# Altium PCB MezzanineDCDC_R1_test.PcbDoc (part 1 of 2)
Units mm, origin at the board's own origin, x right, y up, seen from the top; angles counter-clockwise.
Board outline 70 x 70 mm, 4 copper layers (Top Layer, GND 1, Signal, Bottom Layer), stack 1.554 mm thick; 95 components, 53 nets, 436 pads, 382 vias.
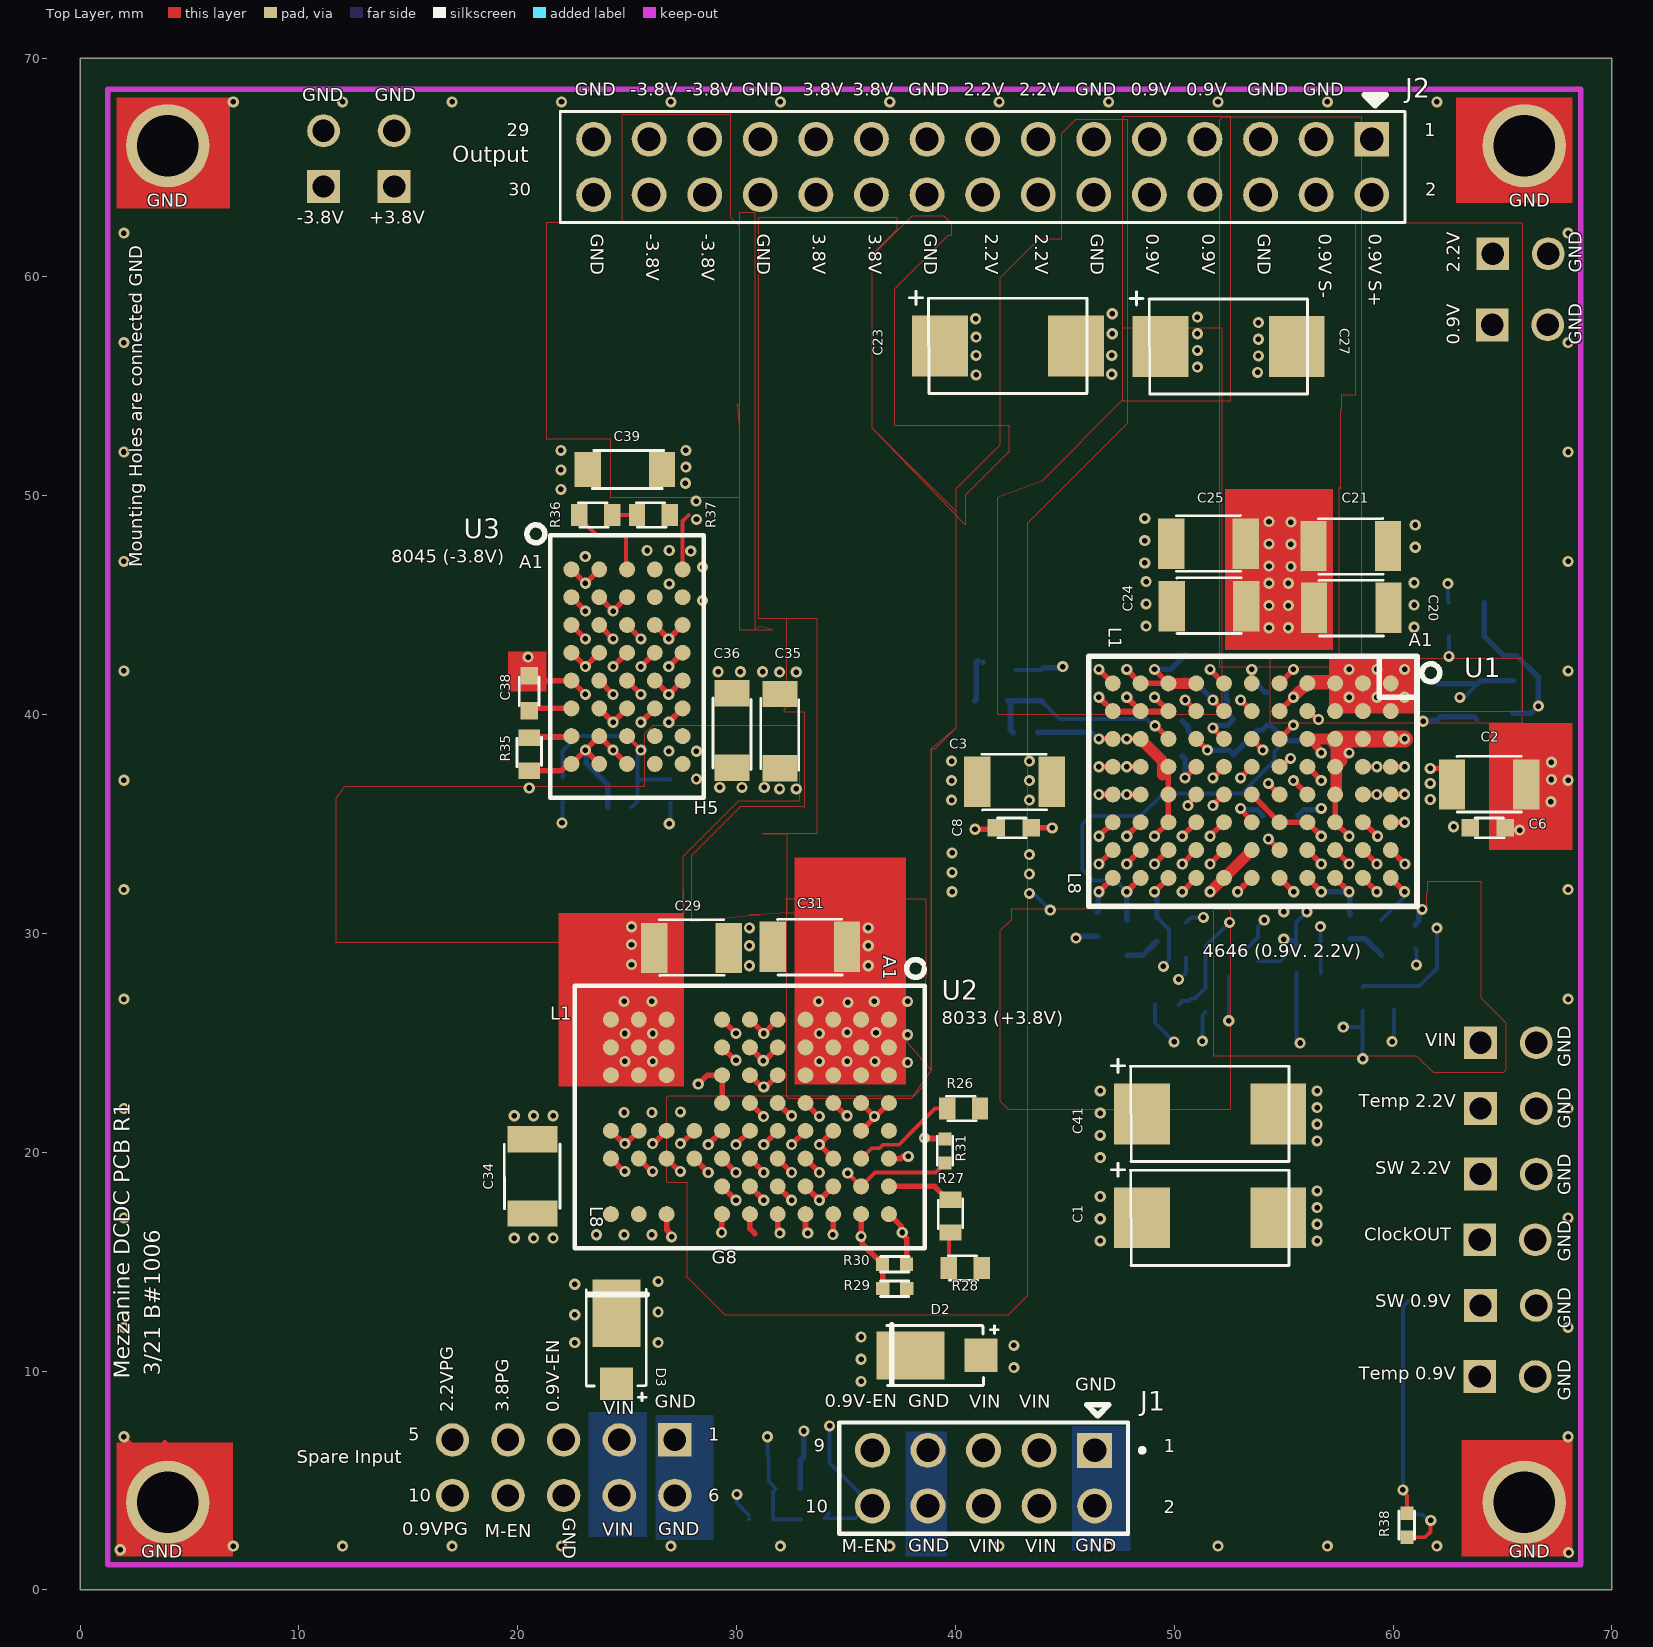
[diagram p0: Top Layer view]
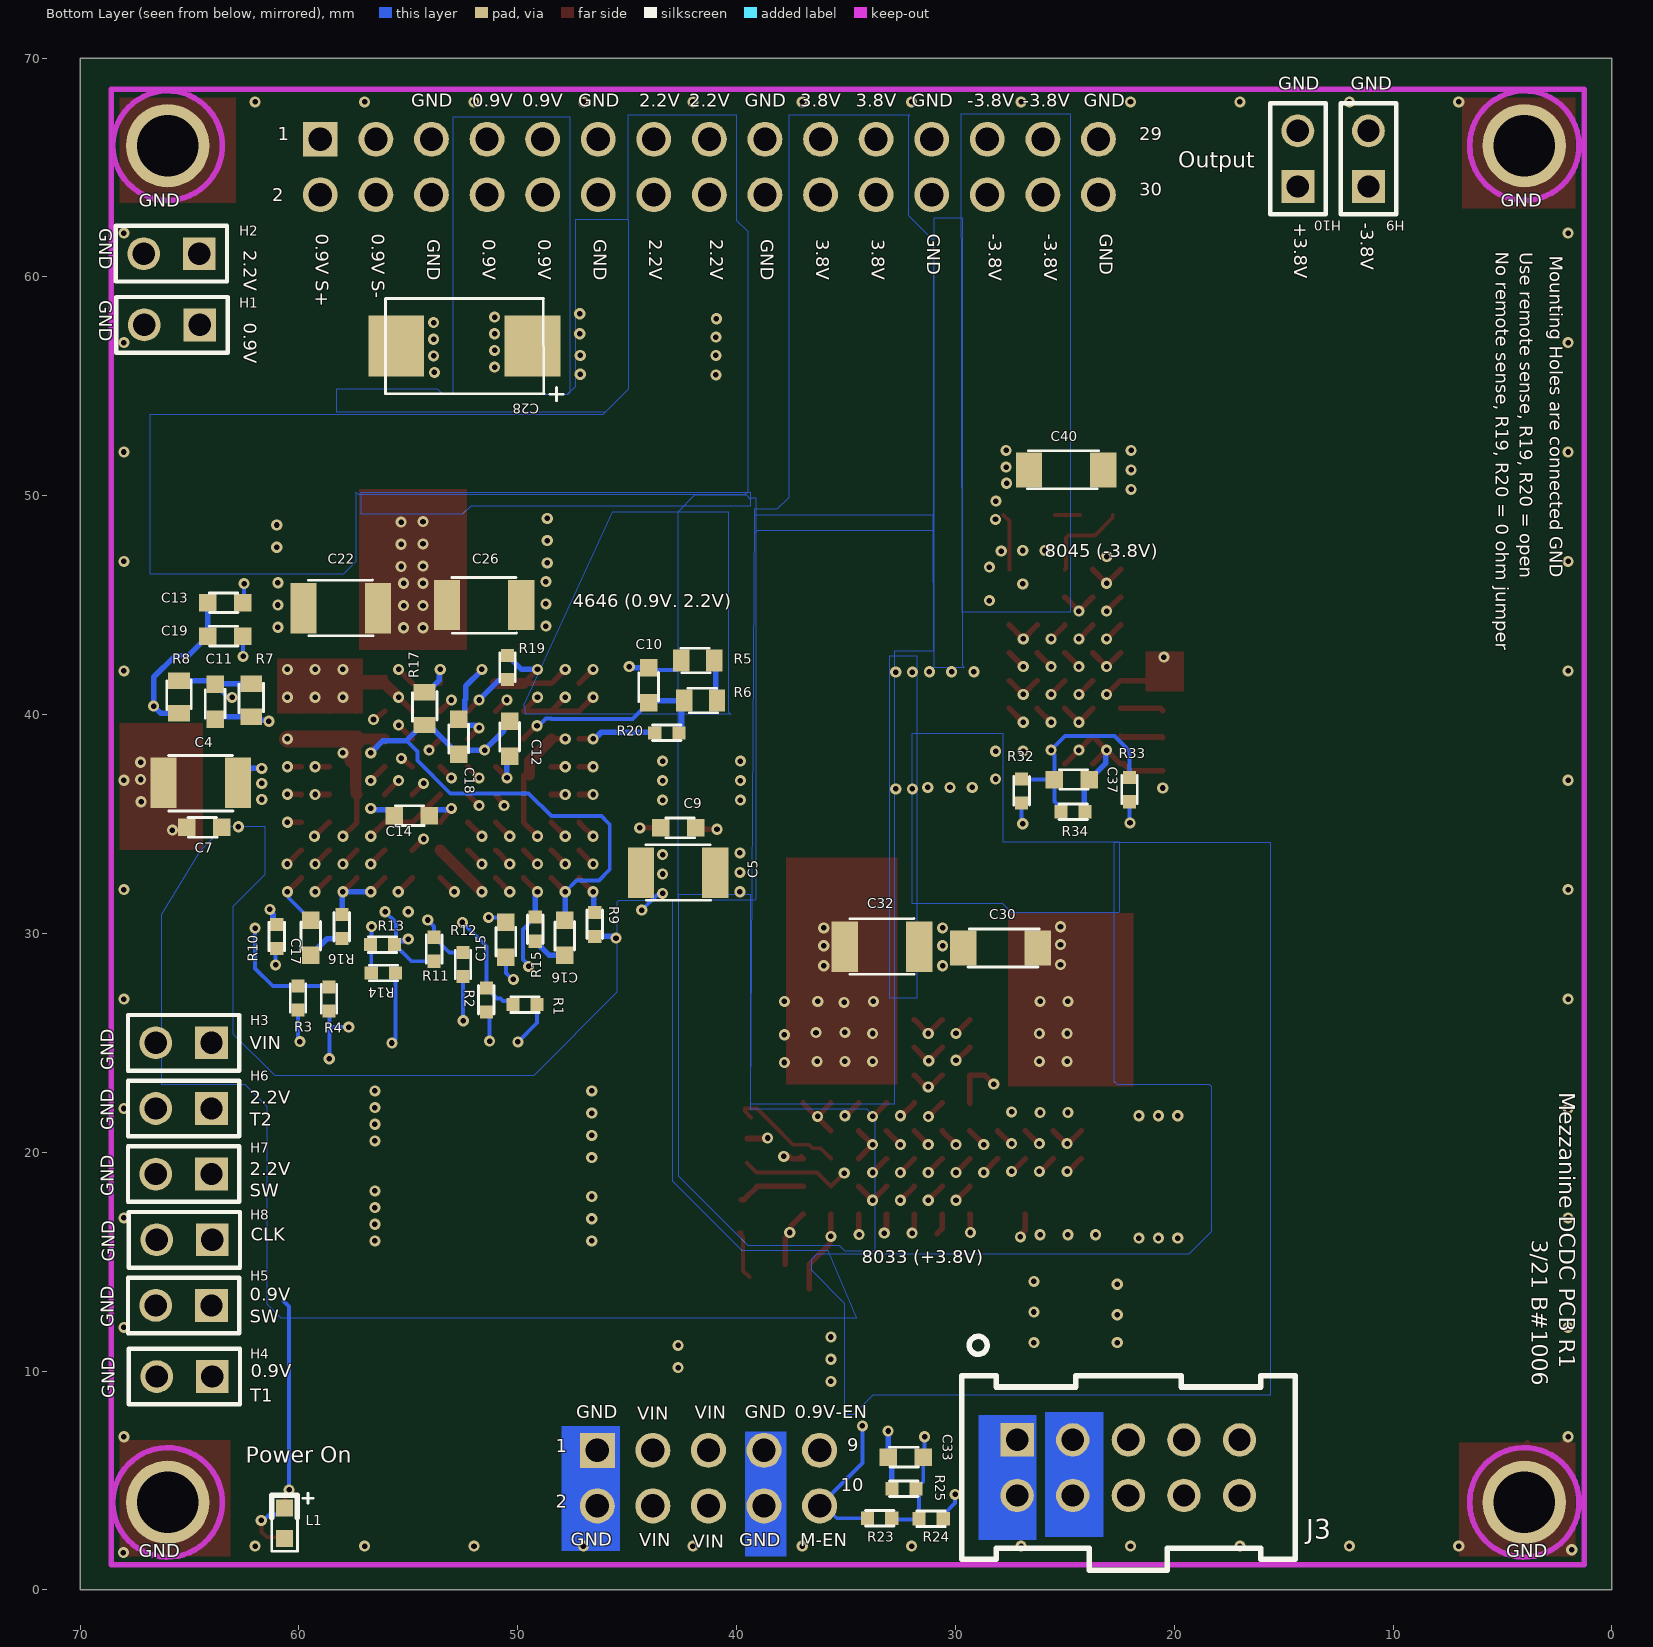
[diagram p1: Bottom Layer view, seen from below]
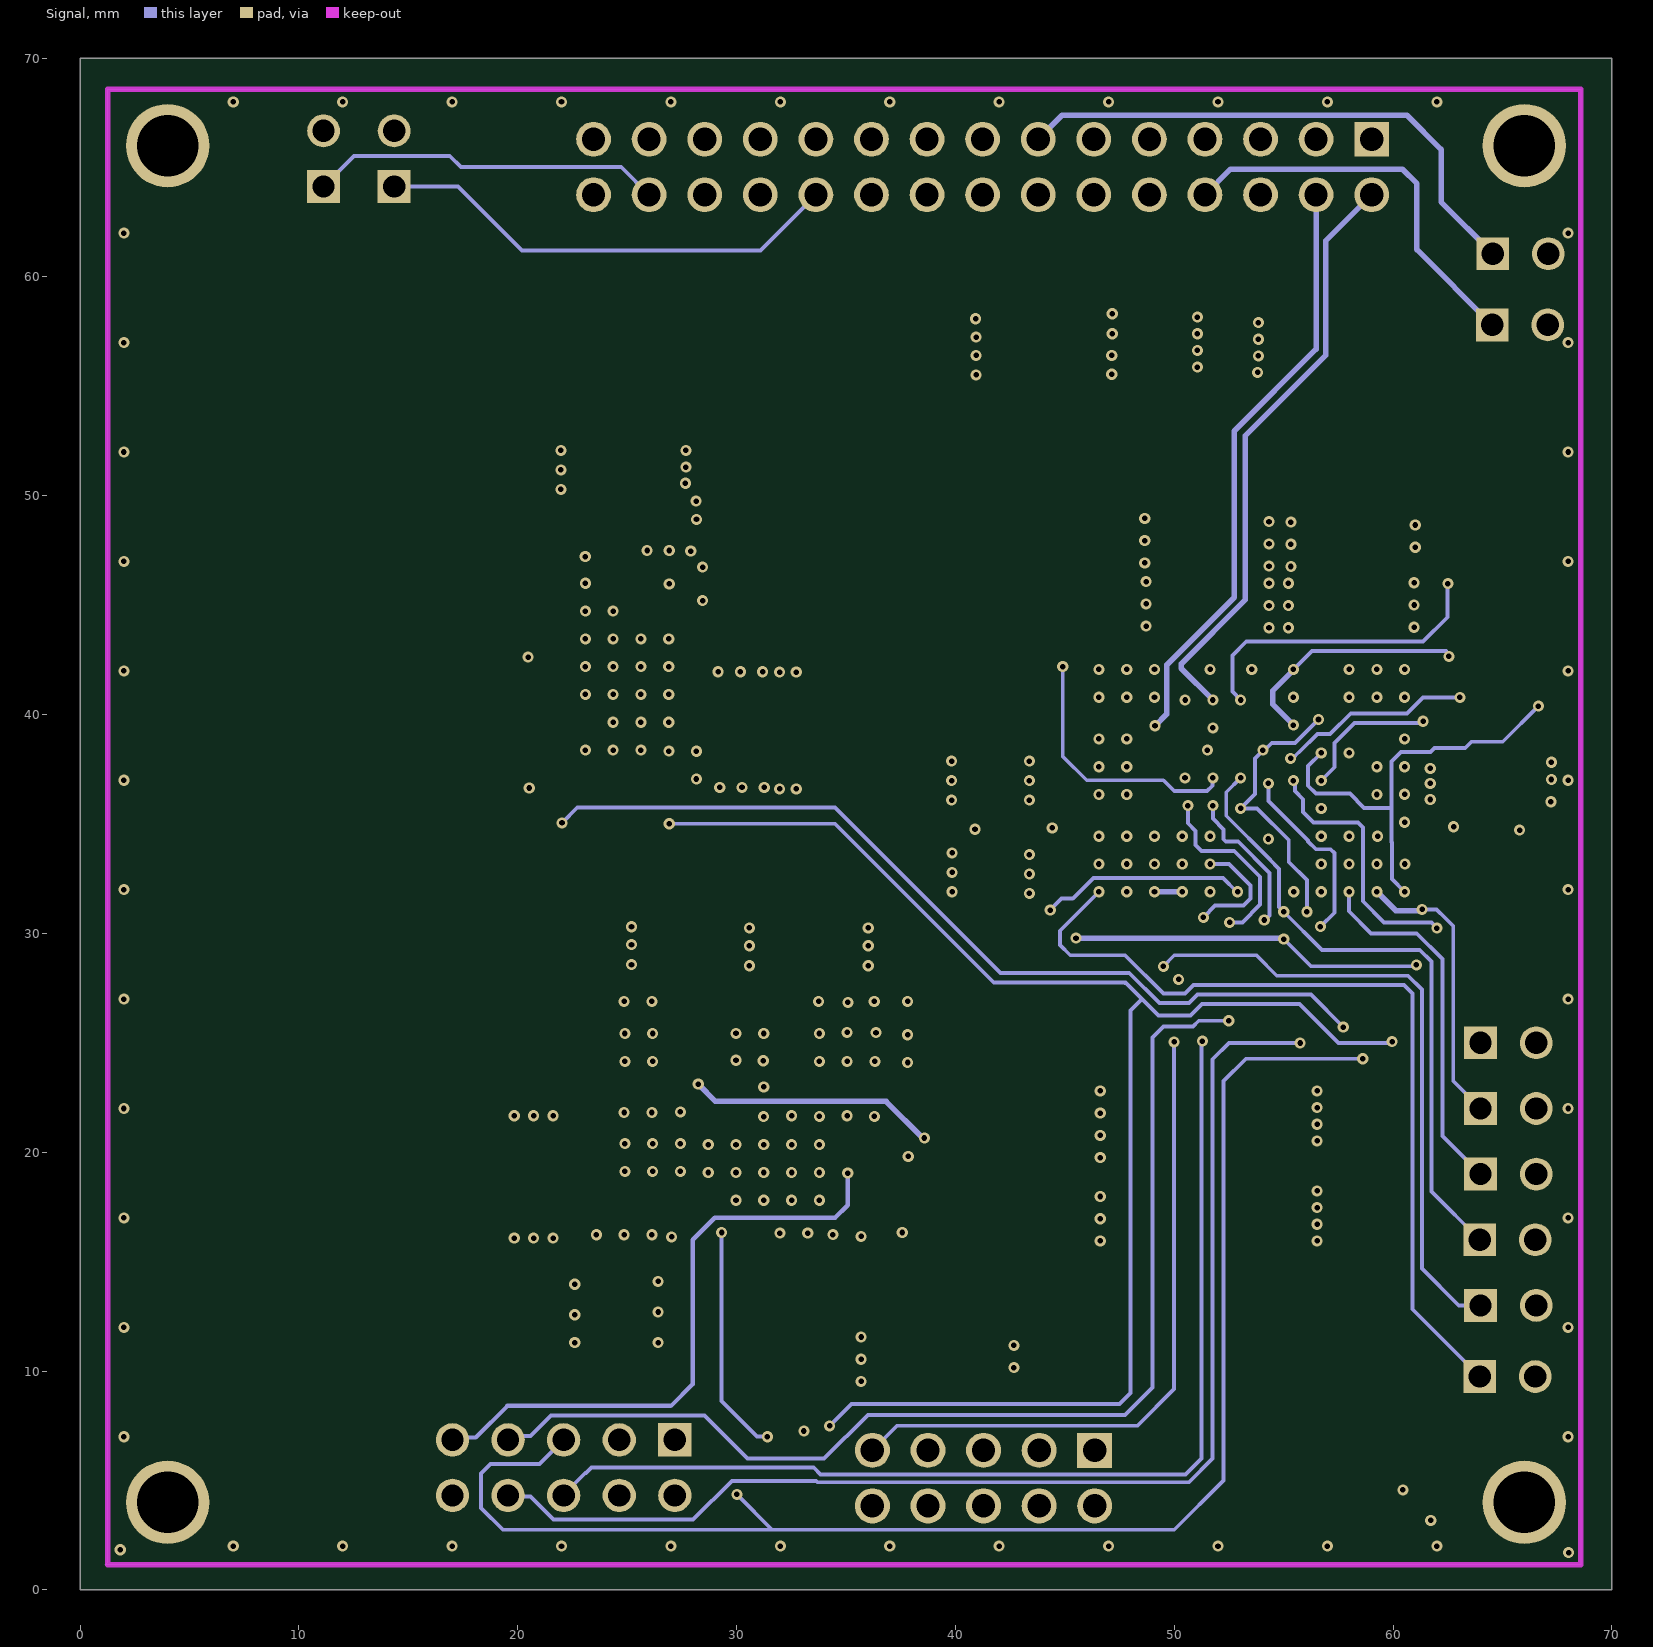
[diagram p2: Signal]

## Layer stack, top to bottom
Top Solder: solder mask 0.0102, Solder Resist, Dk 3.5
Top Layer: signal copper 0.0711
Dielectric 4: prepreg 0.1626, PP-006, Dk 4.1
GND 1: signal copper 0.0356
Dielectric 1: dielectric 1.016, FR-4, Dk 4.8
Signal: signal copper 0.0356
Dielectric 5: prepreg 0.1626, PP-006, Dk 4.1
Bottom Layer: signal copper 0.0711
Bottom Solder: solder mask 0.0102, Solder Resist, Dk 3.5

## Board outline
0,0 0,70 70,70 70,0

## Design rules (kind name [scope] priority, off if disabled: settings)
AssemblyTestPointUsage [All] p0: scope1count=1 scope1_0_kind=Board scope1_0_value=Board scope2count=1 scope2_0_kind=Board scope2_0_value=Board commentlength=0
AssemblyTestpoint [All] p0: scope1count=1 scope1_0_kind=Board scope1_0_value=Board scope2count=1 scope2_0_kind=Board scope2_0_value=Board commentlength=0
Clearance Clearance_1 [All] p0: scope1count=1 scope1_0_kind=Board scope1_0_value=Board scope2count=1 scope2_0_kind=Board scope2_0_value=Board commentlength=0 gap=0.178
Clearance Clearance_1 [All] p1: gap=0.178 ignorepadtopadclearanceinfootprint=FALSE except(0.254: Arc-Fill Arc-Poly Arc-Region Track-Fill Track-Poly Track-Region SMDPad-Fill SMDPad-Poly SMDPad-Region THPad-Fill THPad-Poly THPad-Region Via-Fill Via-Poly Via-Region Fill-Fill Fill-Poly Fill-Region Fill-Hole Poly-Poly Poly-Region Poly-Hole Region-Region Region-Hole)
ComponentClearance [All] p0: scope1count=1 scope1_0_kind=Board scope1_0_value=Board scope2count=1 scope2_0_kind=Board scope2_0_value=Board commentlength=0 gap=0.254 collisioncheckmode=3
DiffPairsRouting [All] p0: scope1count=1 scope1_0_kind=Board scope1_0_value=Board scope2count=1 scope2_0_kind=Board scope2_0_value=Board commentlength=0
DiffPairsRouting [All] p1: maxlimit=0.254 minlimit=0.254 mostfreqgap=0.254 substack1={2EBA0CF7-B037-426B-A4ED-88C65EFE7A22} toplayer_{2eba0cf7-b037-426b-a4ed-88c65efe7a22}_minwidth=0.381 toplayer_{2eba0cf7-b037-426b-a4ed-88c65efe7a22}_maxwidth=0.381 toplayer_{2eba0cf7-b037-426b-a4ed-88c65efe7a22}_prefwidth=0.381 midlayer1_{2eba0cf7-b037-426b-a4ed-88c65efe7a22}_minwidth=0.381 midlayer1_{2eba0cf7-b037-426b-a4ed-88c65efe7a22}_maxwidth=0.381 midlayer1_{2eba0cf7-b037-426b-a4ed-88c65efe7a22}_prefwidth=0.381 midlayer4_{2eba0cf7-b037-426b-a4ed-88c65efe7a22}_minwidth=0.381 midlayer4_{2eba0cf7-b037-426b-a4ed-88c65efe7a22}_maxwidth=0.381 midlayer4_{2eba0cf7-b037-426b-a4ed-88c65efe7a22}_prefwidth=0.381 bottomlayer_{2eba0cf7-b037-426b-a4ed-88c65efe7a22}_minwidth=0.381 bottomlayer_{2eba0cf7-b037-426b-a4ed-88c65efe7a22}_maxwidth=0.381 bottomlayer_{2eba0cf7-b037-426b-a4ed-88c65efe7a22}_prefwidth=0.381 toplayer_minwidth=0.381 toplayer_maxwidth=0.381 toplayer_prefwidth=0.381 midlayer1_minwidth=0.381 midlayer1_maxwidth=0.381 midlayer1_prefwidth=0.381 midlayer4_minwidth=0.381 midlayer4_maxwidth=0.381 midlayer4_prefwidth=0.381 bottomlayer_minwidth=0.381 bottomlayer_maxwidth=0.381 bottomlayer_prefwidth=0.381 substack2={2E0713D7-164F-4516-AF41-5BA8AA759C5D} toplayer_{2e0713d7-164f-4516-af41-5ba8aa759c5d}_minwidth=0.381 toplayer_{2e0713d7-164f-4516-af41-5ba8aa759c5d}_maxwidth=0.381 toplayer_{2e0713d7-164f-4516-af41-5ba8aa759c5d}_prefwidth=0.381 midlayer1_{2e0713d7-164f-4516-af41-5ba8aa759c5d}_minwidth=0.381 midlayer1_{2e0713d7-164f-4516-af41-5ba8aa759c5d}_maxwidth=0.381 midlayer1_{2e0713d7-164f-4516-af41-5ba8aa759c5d}_prefwidth=0.381 midlayer4_{2e0713d7-164f-4516-af41-5ba8aa759c5d}_minwidth=0.381 midlayer4_{2e0713d7-164f-4516-af41-5ba8aa759c5d}_maxwidth=0.381 midlayer4_{2e0713d7-164f-4516-af41-5ba8aa759c5d}_prefwidth=0.381 bottomlayer_{2e0713d7-164f-4516-af41-5ba8aa759c5d}_minwidth=0.381 bottomlayer_{2e0713d7-164f-4516-af41-5ba8aa759c5d}_maxwidth=0.381 bottomlayer_{2e0713d7-164f-4516-af41-5ba8aa759c5d}_prefwidth=0.381 maxuncoupledlength=12.7
FabricationTestPointUsage [All] p0: scope1count=1 scope1_0_kind=Board scope1_0_value=Board scope2count=1 scope2_0_kind=Board scope2_0_value=Board commentlength=0 valid=0 allowmultiple=FALSE
FabricationTestpoint [All] p0: scope1count=1 scope1_0_kind=Board scope1_0_value=Board scope2count=1 scope2_0_kind=Board scope2_0_value=Board commentlength=0 side=3 testpointundercomponent=TRUE minsize=1.016 maxsize=2.54 preferedsize=1.524 minholesize=0 maxholesize=1.016 preferedholesize=0.813 testpointgrid=0.025
FanoutControl Fanout_BGA [All] p0 off: scope1count=1 scope1_0_kind=Board scope1_0_value=Board scope2count=1 scope2_0_kind=Board scope2_0_value=Board commentlength=69 // Protel DXP Scope 1 Expression Was: IsBGA   Fanout_BGA (Default Rule)
FanoutControl Fanout_LCC [All] p0 off: scope1count=1 scope1_0_kind=Board scope1_0_value=Board scope2count=1 scope2_0_kind=Board scope2_0_value=Board commentlength=69 // Protel DXP Scope 1 Expression Was: IsLCC   Fanout_LCC (Default Rule)
FanoutControl Fanout_SOIC [All] p0 off: scope1count=1 scope1_0_kind=Board scope1_0_value=Board scope2count=1 scope2_0_kind=Board scope2_0_value=Board commentlength=71 // Protel DXP Scope 1 Expression Was: IsSOIC   Fanout_SOIC (Default Rule)
FanoutControl Fanout_Small [All] p0 off: scope1count=1 scope1_0_kind=Board scope1_0_value=Board scope2count=1 scope2_0_kind=Board scope2_0_value=Board commentlength=84 // Protel DXP Scope 1 Expression Was: (CompPinCount < 5)   Fanout_Small (Default Rule)
FanoutControl Fanout_Default [All] p0: scope1count=1 scope1_0_kind=Board scope1_0_value=Board scope2count=1 scope2_0_kind=Board scope2_0_value=Board commentlength=30 // Fanout_Default (Default Rule)
Height [All] p0: scope1count=1 scope1_0_kind=Board scope1_0_value=Board scope2count=1 scope2_0_kind=Board scope2_0_value=Board commentlength=0
HoleSize [All] p0: scope1count=1 scope1_0_kind=Board scope1_0_value=Board scope2count=1 scope2_0_kind=Board scope2_0_value=Board commentlength=0 absolutevalues=TRUE maxlimit=3.048 minlimit=0.127 maxpercent=80.000 minpercent=20.000
HoleSize [All] p1: absolutevalues=TRUE maxlimit=3.048 minlimit=0.127 maxpercent=80.000 minpercent=20.000
HoleToHoleClearance [All] p0: scope1count=1 scope1_0_kind=Board scope1_0_value=Board scope2count=1 scope2_0_kind=Board scope2_0_value=Board commentlength=0
LayerPairs [All] p0: scope1count=1 scope1_0_kind=Board scope1_0_value=Board scope2count=1 scope2_0_kind=Board scope2_0_value=Board commentlength=0 enforce=TRUE
MinimumAnnularRing MinimumAnnularRing_1 [All] p0: scope1count=1 scope1_0_kind=Board scope1_0_value=Board scope2count=1 scope2_0_kind=Board scope2_0_value=Board commentlength=0 minimumring=0.178
MinimumAnnularRing [All] p0 off: scope1count=1 scope1_0_kind=Board scope1_0_value=Board scope2count=1 scope2_0_kind=Board scope2_0_value=Board commentlength=44 minimumring=0.127 // Protel DXP Scope 1 Expression Was: IsVia
MinimumAnnularRing [IsVia] p1: minimumring=0.127
MinimumAnnularRing MinimumAnnularRing_1 [All] p2: minimumring=0.178
MinimumSolderMaskSliver [All] p0 off: scope1count=1 scope1_0_kind=Board scope1_0_value=Board scope2count=1 scope2_0_kind=Board scope2_0_value=Board commentlength=0
MinimumSolderMaskSliver [All] p1 off: minsoldermaskwidth=0.254
NetAntennae [All] p0: scope1count=1 scope1_0_kind=Board scope1_0_value=Board scope2count=1 scope2_0_kind=Board scope2_0_value=Board commentlength=0
PasteMaskExpansion [All] p0: scope1count=1 scope1_0_kind=Board scope1_0_value=Board scope2count=1 scope2_0_kind=Board scope2_0_value=Board commentlength=0 expansion=0
PlaneClearance [All] p0: scope1count=1 scope1_0_kind=Board scope1_0_value=Board scope2count=1 scope2_0_kind=Board scope2_0_value=Board commentlength=0 clearance=0.508
PlaneConnect [All] p0: scope1count=1 scope1_0_kind=Board scope1_0_value=Board scope2count=1 scope2_0_kind=Board scope2_0_value=Board commentlength=0 planeconnectstyle=Relief reliefexpansion=0.508 reliefentries=4 reliefconductorwidth=0.254 reliefairgap=0.254
PolygonConnect [All] p0: scope1count=1 scope1_0_kind=Board scope1_0_value=Board scope2count=1 scope2_0_kind=Board scope2_0_value=Board commentlength=0 connectstyle=Relief reliefconductorwidth=0.254 reliefentries=4 polygonreliefangle="90 Angle"
PolygonConnect [All] p1: connectstyle=Relief reliefconductorwidth=0.254 reliefentries=4 polygonreliefangle="90 Angle" airgapwidth=0.254
RoutingCorners [All] p0: scope1count=1 scope1_0_kind=Board scope1_0_value=Board scope2count=1 scope2_0_kind=Board scope2_0_value=Board commentlength=0 cornerstyle=45-Degree minsetback=2.54 maxsetback=2.54
RoutingLayers [All] p0: scope1count=1 scope1_0_kind=Board scope1_0_value=Board scope2count=1 scope2_0_kind=Board scope2_0_value=Board commentlength=0 top layer=Automatic mid layer 1=Automatic mid layer 4=Automatic bottom layer=Automatic
RoutingPriority [All] p0: scope1count=1 scope1_0_kind=Board scope1_0_value=Board scope2count=1 scope2_0_kind=Board scope2_0_value=Board commentlength=0
RoutingTopology [All] p0: scope1count=1 scope1_0_kind=Board scope1_0_value=Board scope2count=1 scope2_0_kind=Board scope2_0_value=Board commentlength=0 topology=Shortest
RoutingVias [All] p0: scope1count=1 scope1_0_kind=Board scope1_0_value=Board scope2count=1 scope2_0_kind=Board scope2_0_value=Board commentlength=0 holewidth=0.711 width=1.27 viastyle="Through Hole" minholewidth=0.711 minwidth=1.27 maxholewidth=0.711 maxwidth=1.27
RoutingVias [All] p1: holewidth=0.711 width=1.27 viastyle="Through Hole" minholewidth=0.711 minwidth=1.27 maxholewidth=0.711 maxwidth=1.27
ShortCircuit [All] p0: scope1count=1 scope1_0_kind=Board scope1_0_value=Board scope2count=1 scope2_0_kind=Board scope2_0_value=Board commentlength=0 allowed=FALSE
SilkToBoardRegionClearance [All] p0: scope1count=1 scope1_0_kind=Board scope1_0_value=Board scope2count=1 scope2_0_kind=Board scope2_0_value=Board commentlength=0
SilkToSilkClearance [All] p0 off: scope1count=1 scope1_0_kind=Board scope1_0_value=Board scope2count=1 scope2_0_kind=Board scope2_0_value=Board commentlength=0
SilkToSilkClearance [All] p1 off: silktosilkclearance=0.254
SilkToSolderMaskClearance [All] p0 off: scope1count=1 scope1_0_kind=Board scope1_0_value=Board scope2count=1 scope2_0_kind=Board scope2_0_value=Board commentlength=44 // Protel DXP Scope 1 Expression Was: IsPad
SilkToSolderMaskClearance [IsPad] p1 off: minsilkscreentomaskgap=0.254 clearancetoexposedcopper=TRUE
SolderMaskExpansion [All] p0: scope1count=1 scope1_0_kind=Board scope1_0_value=Board scope2count=1 scope2_0_kind=Board scope2_0_value=Board commentlength=0 expansion=0.127
SolderMaskExpansion [All] p1: expansion=0.127 istentingtop=FALSE
UnRoutedNet [All] p0: scope1count=1 scope1_0_kind=Board scope1_0_value=Board scope2count=1 scope2_0_kind=Board scope2_0_value=Board commentlength=0
UnpouredPolygon [All] p0: scope1count=1 scope1_0_kind=Board scope1_0_value=Board scope2count=1 scope2_0_kind=Board scope2_0_value=Board commentlength=0
Width [All] p0: scope1count=1 scope1_0_kind=Board scope1_0_value=Board scope2count=1 scope2_0_kind=Board scope2_0_value=Board commentlength=0 maxlimit=2.54 minlimit=0.178 preferedwidth=0.254
Width [All] p1: maxlimit=2.54 minlimit=0.178 preferedwidth=0.254 substack1={2EBA0CF7-B037-426B-A4ED-88C65EFE7A22} substack2={2E0713D7-164F-4516-AF41-5BA8AA759C5D}
25 further rules are at their usual default settings.

## Classes and differential pairs
component class U_MezzanineDCDC_4646: C1 C2 C3 C4 C5 C6 C7 C8 C9 C10 C11 C12 C13 C14 C15 C16 C17 C18 C19 C20 C21 C22 C23 C24 C25 C26 C27 C28 C41 H1 H2 H3 H4 H5 H6 H7 H8 R1 R2 R3 R4 R5 R6 R7 R8 R9 R10 R11 R12 R13 R14 R15 R16 R17 R19 R20 U1
component class U_MezzanineDCDC_8045: C35 C36 C37 C38 C39 C40 H9 R32 R33 R34 R35 R36 R37 U3
component class MezzanineDCDC_Overall: D2 D3 J1 J2 J3 L1 R38
component class U_MezzanineDCDC_8033: C29 C30 C31 C32 C33 C34 H10 R23 R24 R25 R26 R27 R28 R29 R30 R31 U2

## Components (designator, comment, footprint, x,y, rotation, side; value= is the part's Value field where it differs from the comment)
C1 "TAJE107K020RNJ" "CAP 2917 TANTALUM POLARIZED TAJE107K020RNJ" 48.53,17 r0 top locked
C2 "GRM32ER61E226KE15L" "CAP 1210 MURATA" 62.691,36.805 r0 top locked
C3 "GRM32ER61E226KE15L" "CAP 1210 MURATA" 44.398,36.934 r180 top locked
C4 "GRM32ER61E226KE15L" "CAP 1210 MURATA" 62.789,36.881 r0 bottom locked
C5 "GRM32ER61E226KE15L" "CAP 1210 MURATA" 44.37,32.766 r180 bottom locked
C6 "GCM188R71E105KA64D" "CAP 0603 TDK" 63.525,34.823 r0 top locked
C7 "GCM188R71E105KA64D" "CAP 0603 TDK" 63.526,34.849 r0 bottom locked
C8 "C1608X7R1E224K080AC" "CAP 0603 TDK" 43.459,34.823 r180 top locked
C9 "C1608X7R1E224K080AC" "CAP 0603 TDK" 43.459,34.823 r180 bottom locked
C10 "opt" "CAP 0603 TDK" 44.018,42.138 r270 bottom locked
C11 "opt" "CAP 0603 TDK" 63.83,41.376 r270 bottom locked
C12 "0603YC273KAT2A" "CAP 0603 TDK" 50.368,38.1 r90 bottom locked
C13 "0603YC273KAT2A" "CAP 0603 TDK" 62.56,45.11 r0 bottom locked
C14 "C1608X5R1C475K080AC" "CAP 0603 TDK" 54.051,35.382 r0 bottom locked
C15 "C1608X5R1C475K080AC" "CAP 0603 TDK" 50.546,30.505 r270 bottom locked
C16 "opt" "CAP 0603 TDK" 47.854,29.007 r90 bottom locked
C17 "opt" "CAP 0603 TDK" 59.461,29.007 r90 bottom locked
C18 "0603YC101KAT2A" "CAP 0603 TDK" 52.705,39.776 r270 bottom locked
C19 "0603YC101KAT2A" "CAP 0603 TDK" 62.56,43.586 r0 bottom locked
C20 "GRM32ER60J107ME20K" "CAP 1210 Murata" 59.792,44.882 r180 top locked
C21 "GRM32ER60J107ME20K" "CAP 1210 Murata" 59.766,47.701 r180 top locked
C22 "GRM32ER60J107ME20K" "CAP 1210 Murata" 59.792,44.856 r180 bottom locked
C23 "4TPE470MCL" "CAP 2917 Tantalum Polarized" 39.294,56.845 r0 top
C24 "GRM32ER60J107ME20K" "CAP 1210 Murata" 49.889,44.958 r0 top locked
C25 "GRM32ER60J107ME20K" "CAP 1210 Murata" 49.864,47.803 r0 top locked
C26 "GRM32ER60J107ME20K" "CAP 1210 Murata" 49.838,45.009 r0 bottom locked
C27 "4TPE470MCL" "CAP 2917 Tantalum Polarized" 49.378,56.82 r0 top locked
C28 "4TPE470MCL" "CAP 2917 Tantalum Polarized" 49.33,56.843 r0 bottom locked
C29 "GRM32ER61E226KE15L" "CAP 1210 MURATA" 26.242,29.337 r0 top locked
C30 "UMK316BJ475KL-T" "CAP 1206 TDK" 26.242,29.337 r0 bottom locked
C31 "LMK325BJ107MM-T" "CAP 1210 MURATA" 35.05,29.388 r180 top locked
C32 "OPT" "CAP 1210 MURATA" 35.054,29.388 r180 bottom locked
C33 "C1608X7R1E224K080AC" "CAP 0603 TDK" 31.471,6.071 r0 bottom locked
C34 "GRM32ER71H106KA12L" "CAP 1210 MURATA" 20.677,17.196 r90 top locked
C35 "C3216X5R1E476M160AC" "CAP 1206 TDK" 31.979,37.545 r90 top locked
C36 "UMK316BJ475KL-T" "CAP 1206 TDK" 29.794,37.57 r90 top locked
C37 "C1608X7R1E104K080AA" "CAP 0603 TDK" 25.476,37.033 r180 bottom locked
C38 "C1608X7R1E104K080AA" "CAP 0603 TDK" 20.523,40.183 r90 top locked
C39 "12066D476MAT4A" "CAP 1206 TDK 2.3 Height" 26.594,51.206 r180 top locked
C40 "opt" "CAP 1206 TDK 2.3 Height" 26.641,51.181 r180 bottom locked
C41 "TAJE107K020RNJ" "CAP 2917 TANTALUM POLARIZED TAJE107K020RNJ" 48.53,21.75 r0 top locked
D2 "V8PAL50-M3/I" "SCHOTTKY DIODE V8PAL50-M3/I" 37.953,10.719 r0 top locked
D3 "V8PAL50-M3/I" "SCHOTTKY DIODE V8PAL50-M3/I" 24.511,12.643 r270 top locked
H1 "Header" "HEADER 2PIN" 64.53,57.81 r180 bottom locked
H2 "Header" "HEADER 2PIN" 64.555,61.062 r180 bottom locked
H3 "Header" "HEADER 2PIN" 64,25 r180 bottom locked
H4 "Header" "HEADER 2PIN" 63.96,9.75 r180 bottom locked
H5 "Header" "HEADER 2PIN" 64,13 r180 bottom locked
H6 "Header" "HEADER 2PIN" 64,22 r180 bottom locked
H7 "Header" "HEADER 2PIN" 64,19 r180 bottom locked
H8 "Header" "HEADER 2PIN" 63.96,16 r180 bottom locked
H9 "Header" "HEADER 2PIN" 11.125,64.135 r270 bottom locked
H10 "Header" "HEADER 2PIN" 14.351,64.135 r270 bottom locked
J1 "Samtec IPT1-105-01-L-D" SAMTEC_IPT1-105-01-L-D 46.367,6.379 r180 top locked
J2 "Samtec IPT1-115-01-L-D" IPT1-115-01-L-D 59.023,66.292 r180 top locked
J3 "Samtec IPL1-105-01-L-D" IPL1-105-01-L-D 27.178,6.858 r180 bottom locked
L1 "LTST-C191KRKT" LED 60.655,3.734 r180 bottom locked
R1 "CRCW04020000ZSTD" "RESISTOR ERJ2G/CRCW 0402" 50.216,26.746 r180 bottom locked
R2 "opt" "RESISTOR ERJ2G/CRCW 0402" 51.435,27.508 r270 bottom locked
R3 "CRCW04020000ZSTD" "RESISTOR ERJ2G/CRCW 0402" 60.046,27.592 r270 bottom locked
R4 "opt" "RESISTOR ERJ2G/CRCW 0402" 58.623,27.559 r270 bottom locked
R5 "ERA-3AEB124V" "RESISTOR 0603 - ERJ" 41.021,42.469 r0 bottom locked
R6 "ERA-3AEB8250V" "RESISTOR 0603 - ERJ" 42.394,40.64 r180 bottom locked
R7 "ERA-3AEB2262V" "RESISTOR 0603 - ERJ" 62.179,39.903 r90 bottom locked
R8 "ERA-3AEB1652V" "RESISTOR 0603 - ERJ" 65.481,40.054 r90 bottom locked
R9 "ERA-2AEB4992X" "RESISTOR ERJ2G/CRCW 0402" 46.482,30.963 r270 bottom locked
R10 "ERA-2AEB4992X" "RESISTOR ERJ2G/CRCW 0402" 61.011,30.404 r270 bottom locked
R11 "ERJ-2GEJ103X" "RESISTOR ERJ2G/CRCW 0402" 53.823,29.827 r270 bottom locked
R12 "ERJ-2GEJ102X" "RESISTOR ERJ2G/CRCW 0402" 52.502,28.034 r90 bottom locked
R13 "ERJ-2GEJ103X" "RESISTOR ERJ2G/CRCW 0402" 56.726,29.489 r180 bottom locked
R14 "ERJ-2GEJ102X" "RESISTOR ERJ2G/CRCW 0402" 55.593,28.194 r0 bottom locked
R15 "opt" "RESISTOR ERJ2G/CRCW 0402" 49.2,29.642 r90 bottom locked
R16 "opt" "RESISTOR ERJ2G/CRCW 0402" 58.039,29.761 r90 bottom locked
R17 "ERA-3AEB333V" "RESISTOR 0603 - ERJ" 54.254,39.522 r90 bottom locked
R19 "opt" "RESISTOR ERJ2G/CRCW 0402" 50.47,42.705 r270 bottom locked
R20 "opt" "RESISTOR ERJ2G/CRCW 0402" 43.739,39.167 r180 bottom locked
R23 "ERJ-U02F1502X" "RESISTOR ERJ2G/CRCW 0402" 32.911,3.277 r0 bottom locked
R24 "opt" "RESISTOR ERJ2G/CRCW 0402" 31.656,3.251 r180 bottom locked
R25 "opt" "RESISTOR ERJ2G/CRCW 0402" 32.901,4.623 r180 bottom locked
R26 "ERJ-PB3B1782V" "RESISTOR 0603 - ERJ" 41.124,21.996 r180 top locked
R27 "ERA-3AEB134V" "RESISTOR 0603 - ERJ" 39.778,16.332 r90 top locked
R28 "ERA-3AEB8250V" "RESISTOR 0603 - ERJ" 41.2,14.707 r180 top locked
R29 "opt" "RESISTOR ERJ2G/CRCW 0402" 36.678,13.767 r0 top locked
R30 "ERJ-2GEJ103X" "RESISTOR ERJ2G/CRCW 0402" 37.77,14.884 r180 top locked
R31 "ERJ-2RKF1003X" "RESISTOR ERJ2G/CRCW 0402" 39.522,20.607 r270 top locked
R32 "CRCW04024K99FKED" "RESISTOR ERJ2G/CRCW 0402" 26.975,37.059 r270 bottom locked
R33 "opt" "RESISTOR ERJ2G/CRCW 0402" 22.047,37.117 r270 bottom locked
R34 "opt" "RESISTOR ERJ2G/CRCW 0402" 24.071,35.56 r0 bottom locked
R35 "ERJ-PB3B6492V" "RESISTOR 0603 - ERJ" 20.523,37.44 r90 top locked
R36 "ERA-3AEB4532V" "RESISTOR 0603 - ERJ" 24.309,49.124 r180 top locked
R37 "ERA-3AEB301V" "RESISTOR 0603 - ERJ" 26.951,49.124 r180 top locked
R38 "ERJ-2GEJ102X" "RESISTOR ERJ2G/CRCW 0402" 60.63,3.505 r270 top locked
U1 "LTM4646IY_REV_0" LTM4646 53.543,36.982 r270 top locked net-tie
U2 "LTM8033EY#PBF" "LTM8033 BGA" 30.609,21.615 r270 top locked
U3 "LTM8045EY#PBF" LTM8045 24.994,42.189 r0 top locked

## Footprints (in the part's own frame and the unit in brackets; to place one, negate y for a bottom-side part, rotate by r counter-clockwise, add the part's x,y. Pads: shape width x height; smd on the part's side, far side on the other; paste and mask are expansions set on the pad)
"CAP 0603 TDK" [mm]
  rect 0.8x0.8 smd: 1(0,0) 2(1.6,0)
  silkscreen extent 0.22,-0.45 1.54,0.45
"CAP 1206 TDK" [mm]
  rect 1.2x1.6 smd: 1(0,0) 2(3.4,0)
  silkscreen extent -0.08,-0.86 3.19,0.87
"CAP 1206 TDK 2.3 Height" [mm]
  rect 1.2x1.6 smd: 1(0,0) 2(3.4,0)
  silkscreen extent -0.08,-0.86 3.19,0.87
"CAP 1210 MURATA" [mm]
  rect 1.2x2.3 smd: 1(0,0) 2(3.4,0)
  silkscreen extent 0.23,-1.26 3.18,1.29
"CAP 1210 Murata" [mm]
  rect 1.2x2.3 smd: 1(0,0) 2(3.4,0)
  silkscreen extent 0.23,-1.26 3.18,1.29
"CAP 2917 Tantalum Polarized" [mm]
  rect 2.55x2.77 smd: 1(0,0) 2(6.22,0)
  silkscreen extent -1.4,-2.18 6.72,2.5
"CAP 2917 TANTALUM POLARIZED TAJE107K020RNJ" [mm]
  rect 2.55x2.77 smd: 1(0,0) 2(6.22,0)
  silkscreen extent -1.4,-2.18 6.72,2.5
"HEADER 2PIN" [mm]
  rect 1.5x1.5 hole 1.016: 1(0,0)
  round 1.5 hole 1.016: 2(-2.54,0)
  silkscreen extent -3.81,-1.27 1.27,1.27
IPL1-105-01-L-D [mil] "Discrete wire header"
  rect 60x60 hole 40 mask+0: 1(0,0)
  round 60 hole 40 mask+0: 2(100,0) 3(200,0) 4(300,0) 6(0,-100) 7(100,-100) 8(200,-100) 9(300,-100) 10(400,-100)
  round 60 hole 40: 5(400,0)
  silkscreen extent -100,-235 500,115
IPT1-115-01-L-D [mm]
  rect 1.59x1.59 hole 1.06: 1(0,0)
  round 1.59 hole 1.06: 2(0,2.54) 3(2.54,0) 4(2.54,2.54) 5(5.08,0) 6(5.08,2.54) 7(7.62,0) 8(7.62,2.54) 9(10.16,0) 10(10.16,2.54) 11(12.7,0) 12(12.7,2.54) 13(15.24,0) 14(15.24,2.54) 15(17.78,0) 16(17.78,2.54) 17(20.32,0) 18(20.32,2.54) 19(22.86,0) 20(22.86,2.54) 21(25.4,0) 22(25.4,2.54) 23(27.94,0) 24(27.94,2.54) 25(30.48,0) 26(30.48,2.54) 27(33.02,0) 28(33.02,2.54) 29(35.56,0) 30(35.56,2.54)
  silkscreen extent -1.52,-1.9 37.08,3.81
LED [mil]
  rect 30x30 smd: 1(0,0.5) 2(0,-54.5)
  silkscreen extent -23,-78 51,27
LTM4646 [mm]
  round 0.73 smd: A1(-4.445,6.35) A2(-3.175,6.35) A3(-1.905,6.35) A4(-0.635,6.35) A5(0.635,6.35) A6(1.905,6.35) A7(3.175,6.35) A8(4.445,6.35) B1(-4.445,5.08) B2(-3.175,5.08) B3(-1.905,5.08) B4(-0.635,5.08) B5(0.635,5.08) B6(1.905,5.08) B7(3.175,5.08) B8(4.445,5.08) C1(-4.445,3.81) C2(-3.175,3.81) C3(-1.905,3.81) C4(-0.635,3.81) C5(0.635,3.81) C6(1.905,3.81) C7(3.175,3.81) C8(4.445,3.81) D1(-4.445,2.54) D2(-3.175,2.54) D3(-1.905,2.54) D4(-0.635,2.54) D5(0.635,2.54) D6(1.905,2.54) D7(3.175,2.54) D8(4.445,2.54) E1(-4.445,1.27) E2(-3.175,1.27) E3(-1.905,1.27) E4(-0.635,1.27) E5(0.635,1.27) E6(1.905,1.27) E7(3.175,1.27) E8(4.445,1.27) F1(-4.445,0) F2(-3.175,0) F3(-1.905,0) F4(-0.635,0) F5(0.635,0) F6(1.905,0) F7(3.175,0) F8(4.445,0) G1(-4.445,-1.27) G2(-3.175,-1.27) G3(-1.905,-1.27) G4(-0.635,-1.27) G5(0.635,-1.27) G6(1.905,-1.27) G7(3.175,-1.27) G8(4.445,-1.27) H1(-4.445,-2.54) H2(-3.175,-2.54) H3(-1.905,-2.54) H4(-0.635,-2.54) H5(0.635,-2.54) H6(1.905,-2.54) H7(3.175,-2.54) H8(4.445,-2.54) J1(-4.445,-3.81) J2(-3.175,-3.81) J3(-1.905,-3.81) J4(-0.635,-3.81) J5(0.635,-3.81) J6(1.905,-3.81) J7(3.175,-3.81) J8(4.445,-3.81) K1(-4.445,-5.08) K2(-3.175,-5.08) K3(-1.905,-5.08) K4(-0.635,-5.08) K5(0.635,-5.08) K6(1.905,-5.08) K7(3.175,-5.08) K8(4.445,-5.08) L1(-4.445,-6.35) L2(-3.175,-6.35) L3(-1.905,-6.35) L4(-0.635,-6.35) L5(0.635,-6.35) L6(1.905,-6.35) L7(3.175,-6.35) L8(4.445,-6.35)
  Top Layer lines w0.508: -1.905,2.54 -1.905,3.81
  silkscreen extent -5.69,-7.45 5.74,7.55
"LTM8033 BGA" [mm]
  round 0.73 smd: A1(-4.445,6.35) A2(-3.175,6.35) A3(-1.905,6.35) A4(-0.635,6.35) A5(0.635,6.35) A6(1.905,6.35) A7(3.175,6.35) A8(4.445,6.35) B1(-4.445,5.08) B2(-3.175,5.08) B3(-1.905,5.08) B4(-0.635,5.08) B5(0.635,5.08) B6(1.905,5.08) B7(3.175,5.08) B8(4.445,5.08) C1(-4.445,3.81) C2(-3.175,3.81) C3(-1.905,3.81) C4(-0.635,3.81) C5(0.635,3.81) C6(1.905,3.81) C7(3.175,3.81) C8(4.445,3.81) D1(-4.445,2.54) D2(-3.175,2.54) D3(-1.905,2.54) D4(-0.635,2.54) D5(0.635,2.54) D6(1.905,2.54) D7(3.175,2.54) D8(4.445,2.54) E1(-4.445,1.27) E2(-3.175,1.27) E3(-1.905,1.27) E4(-0.635,1.27) E5(0.635,1.27) E6(1.905,1.27) E7(3.175,1.27) E8(4.445,1.27) F1(-4.445,0) F2(-3.175,0) F3(-1.905,0) F4(-0.635,0) F5(0.635,0) F6(1.905,0) F7(3.175,0) F8(4.445,0) G1(-4.445,-1.27) G2(-3.175,-1.27) G3(-1.905,-1.27) G4(-0.635,-1.27) G5(0.635,-1.27) G6(1.905,-1.27) G7(3.175,-1.27) G8(4.445,-1.27) H5(0.635,-2.54) H6(1.905,-2.54) J1(-4.445,-3.81) J2(-3.175,-3.81) J3(-1.905,-3.81) J5(0.635,-3.81) J6(1.905,-3.81) J8(4.445,-3.81) K1(-4.445,-5.08) K2(-3.175,-5.08) K3(-1.905,-5.08) K5(0.635,-5.08) K6(1.905,-5.08) K8(4.445,-5.08) L1(-4.445,-6.35) L2(-3.175,-6.35) L3(-1.905,-6.35) L5(0.635,-6.35) L6(1.905,-6.35) L8(4.445,-6.35)
  silkscreen extent -6,-8 6,8
LTM8045 [mm] "DCDC Converter"
  round 0.73 smd: A1(-2.54,4.445) A2(-1.27,4.445) A3(0,4.445) A4(1.27,4.445) A5(2.54,4.445) B1(-2.54,3.175) B2(-1.27,3.175) B3(0,3.175) B4(1.27,3.175) B5(2.54,3.175) C1(-2.54,1.905) C2(-1.27,1.905) C3(0,1.905) C4(1.27,1.905) C5(2.54,1.905) D1(-2.54,0.635) D2(-1.27,0.635) D3(0,0.635) D4(1.27,0.635) D5(2.54,0.635) E1(-2.54,-0.635) E2(-1.27,-0.635) E3(0,-0.635) E4(1.27,-0.635) E5(2.54,-0.635) F1(-2.54,-1.905) F2(-1.27,-1.905) F3(0,-1.905) F4(1.27,-1.905) F5(2.54,-1.905) G1(-2.54,-3.175) G2(-1.27,-3.175) G3(0,-3.175) G4(1.27,-3.175) G5(2.54,-3.175) H1(-2.54,-4.445) H2(-1.27,-4.445) H3(0,-4.445) H4(1.27,-4.445) H5(2.54,-4.445)
  silkscreen extent -3.5,-6 3.5,6
"RESISTOR 0603 - ERJ" [mm]
  rect 0.75x1 smd: 1(0,0) 2(1.5,0)
  silkscreen extent 0.18,-0.56 1.53,0.56
"RESISTOR ERJ2G/CRCW 0402" [mm]
  rect 0.6x0.6 smd: 1(0,0) 2(1.1,0)
  silkscreen extent -0.11,-0.36 1.19,0.36
SAMTEC_IPT1-105-01-L-D [mil]
  rect 63x63 hole 42: 01(0,0)
  round 63 hole 42: 02(0,100) 03(100,0) 04(100,100) 05(200,0) 06(200,100) 07(300,0) 08(300,100) 09(400,0) 10(400,100)
  silkscreen extent -89,-50 460,150
"SCHOTTKY DIODE V8PAL50-M3/I" [mm]
  rect 3.1x2.2 smd: 1(0,0)
  rect 1.5x1.52 smd: 2(3.22,0)
  silkscreen extent -1.09,-1.38 4,1.39

## Part data
C1 C41: library part "Capacitor 2917 TAJE107K020RNJ", "100µF Molded Tantalum Capacitors 20V 2917 (7343 Metric) 400mOhm"
C2 C3 C4 C5 C29: library part "Capacitor 1210", "22µF ±10% 25V Ceramic Capacitor X5R 1210 (3225 Metric)"
C6 C7: library part "Capacitor 0603 TDK", "1µF ±10% 25V Ceramic Capacitor X7R 0603 (1608 Metric)"
C8 C9 C33: library part "Capacitor 0603 TDK", "CAP CER 0.22UF 25V X7R 0603"
C10 C11 C16 C17: library part "Capacitor 0603 TDK", "Capacitor 0603"
C12 C13: library part "Capacitor 0603 TDK", "0.027µF ±10% 16V Ceramic Capacitor X7R 0603 (1608 Metric)"
C14 C15: library part "Capacitor 0603 TDK", "CAP CER 4.7UF 16V X5R 0603"
C18 C19: library part "Capacitor 0603 TDK", "100pF ±10% 16V Ceramic Capacitor X7R 0603 (1608 Metric)"
C20 C21 C22 C24 C25 C26: library part "Capacitor 1210", "100µF ±20% 6.3V Ceramic Capacitor X5R 1210 (3225 Metric)"
C23 C27 C28: library part "Capacitor 2917 Panasonic", "470µF Molded Tantalum Polymer Capacitor 4V 2917 (7343 Metric) 12mOhm @ 100kHz"
C30 C36: library part "Capacitor 1206", "4.7µF ±10% 50V Ceramic Capacitor X5R 1206 (3216 Metric)"
C31: library part "Capacitor 1210", "CAP CER 100UF 10V X5R 1210"
C32: library part "Capacitor 1210", "Cap 1210"
C34: library part "Capacitor 1210", "CAP CER 10UF 50V X7R 1210"
C35: library part "Capacitor 1206", "47µF ±20% 25V Ceramic Capacitor X5R 1206 (3216 Metric)"
C37 C38: library part "Capacitor 0603 TDK", "CAP CER 0.1UF 25V X7R 0603"
C39: library part "Capacitor 1206 2.3mmHeight", "47µF ±20% 6.3V Ceramic Capacitor X5R 1206 (3216 Metric)"
C40: library part "Capacitor 1206 2.3mmHeight"
D2 D3: library part "Schotkky Diode", "Diode Schottky 50V 4A Surface Mount DO-221BC (SMPA)"
H1 H2 H3 H4 H5 H6 H7 H8 H9 H10: library part "Header - 2Pin", "Connector Header Through Hole 2 position 0.100\" (2.54mm)"
J1: "CONN HEADER VERT 10POS 2.54MM"
J2: "15x2 Pin Connector CONN HEADER VERT 30POS 2.54MM"
J3: "5x2 Pin connector"
L1: library part LED, "Red 631nm LED Indication - Discrete 2V 0603 (1608 Metric)"
R1 R3: library part "ERJ2G Resistor 0402", "Jumper 0.063W, 1/16W Chip Resistor 0402 (1005 Metric) Automotive AEC-Q200 Thick Film"
R2 R4 R15 R16 R19 R20 R24 R25 R29 R33 R34: library part "ERJ2G Resistor 0402", "Resistor 0402"
R5: library part "Resistor 0603", "120 kOhms ±0.1% 0.1W, 1/10W Chip Resistor 0603 (1608 Metric) Automotive AEC-Q200 Thin Film"
R6 R28: library part "Resistor 0603", "RES SMD 825 OHM 0.1% 1/10W 0603"
R7: library part "Resistor 0603", "22.6 kOhms ±0.1% 0.1W, 1/10W Chip Resistor 0603 (1608 Metric) Automotive AEC-Q200 Thin Film"
R8: library part "Resistor 0603", "16.5 kOhms ±0.1% 0.1W, 1/10W Chip Resistor 0603 (1608 Metric) Automotive AEC-Q200 Thin Film"
R9 R10: library part "ERJ2G Resistor 0402", "49.9 ±0.1% 0.063W, 1/16W Chip Resistor 0402 (1005 Metric) Automotive AEC-Q200 Thin Film"
R11 R13 R30: library part "ERJ2G Resistor 0402", "RES SMD 10K OHM 5% 1/10W 0402"
R12 R14 R38: library part "ERJ2G Resistor 0402", "RES SMD 1K OHM 5% 1/10W 0402"
R17: library part "Resistor 0603", "33 ±0.1% 0.1W, 1/10W Chip Resistor 0603 (1608 Metric) Automotive AEC-Q200 Thin Film"
R23: library part "ERJ2G Resistor 0402", "RES 15K OHM 1% 1/10W 0402 SMD"
R26: library part "Resistor 0603", "RES SMD 17.8K OHM 0.1% 1/5W 0603"
R27: library part "Resistor 0603", "RES SMD 130K OHM 0.1% 1/10W 0603"
R31: library part "ERJ2G Resistor 0402", "RES SMD 100K OHM 1% 1/10W 0402"
R32: library part "ERJ2G Resistor 0402", "RES, Thick Film, 4.99 kOhm, 1.0 %, 1/16 W, SMD, 0402"
R35: library part "Resistor 0603", "64.9 ±0.1% 0.2W, 1/5W Chip Resistor 0603 (1608 Metric) Automotive AEC-Q200, Pulse Withstanding Thick Film"
R36: library part "Resistor 0603", "RES SMD 45.3KOHM 0.1% 1/10W 0603"
R37: library part "Resistor 0603", "RES SMD 300 OHM 0.1% 1/10W 0603"
U1: library part "LTM4646IY 05-11-0399"
U2: library part LTM8033, "Non-Isolated PoL Module DC DC Converter Output 0.8 ~ 24V - - 3A 3.6V - 36V Input"
U3: library part LTM8045, "Non-Isolated PoL Module DC DC Converter Output -2.5 ~ -15V, 2.5 ~ 15V - - 700mA 2.8V - 18V Input"

## Free pads (board coordinates)
  round 3.81 hole 2.8: 1(4,4) 2(4,66) 3(66,66) 4(66,4)

## Via types
v1: diameter 0.508, hole 0.254, Top Layer to Bottom Layer, tented both sides, 382 vias

## Nets (pads, with @x,y where several pads share a name; then routed paths per layer and width w, separated by ;. In a path a pad name is that pad's centre, name@x,y a point inside that pad or via, vN(x,y) a via of type N, cw(c..) or ccw(c..) an arc to the next point about the centre after c; other vN are vias at no path point)
0.9V: C24.1 C25.1 C26.1 C27.1 C28.1 H1.1 J2.7 J2.8 J2.9 J2.10 R19.1 U1.H1 U1.J1 U1.J2 U1.K1 U1.K2 U1.L1 U1.L2 | length 30.4
  Top Layer w0.254: v1(46.558,40.792) U1.L2@47.193,40.157 U1.K2@48.463,40.157 ; v1(46.558,42.062) U1.L1@47.193,41.427 ; v1(47.828,40.792) U1.K2@48.463,40.157 ; v1(47.828,42.062) U1.K1@48.463,41.427 U1.J1@49.733,41.427 v1(49.098,42.062) ; v1(49.098,40.792) U1.J2@49.733,40.157 U1.K2@48.463,40.157
  Top Layer w0.508: U1.J1@49.733,41.427 U1.H1@51.003,41.427
  Signal w0.254: J2.8@51.403,63.752 52.579,64.928 60.421,64.928 61.087,64.262 61.087,61.253 H1.1@64.53,57.81
  Bottom Layer w0.254: v1(49.098,42.062) 49.827,42.062 R19.1@50.47,42.705
  other v1: 48.717,44.044 48.717,45.06 48.717,46.076 48.653,46.934 48.653,47.95 48.653,48.966 51.054,55.88 51.054,56.642 51.054,57.404 51.054,58.166
0.9V_PGood: J3.4 R12.1 | length 53.9
  Signal w0.178: J3.4@19.558,6.858 19.736,7.036 20.587,7.036 21.514,7.963 28.537,7.963 30.5,6 34,6 36,8 47.75,8 49,9.25 49,25.25 49.5,25.75 50.861,25.75 51.122,26.011 v1(52.489,26.011)
  Bottom Layer w0.178: v1@52.5,26.011 52.5,28.032 R12.1@52.502,28.034
2.2V: C20.1 C21.1 C22.1 C23.1 H2.1 J2.13 J2.14 J2.15 J2.16 U1.A1 U1.A2 U1.B1 U1.B2 U1.C1 U1.C2 U1.D1 U1.E2 | length 34.1
  Top Layer w0.254: U1.E2@54.813,40.157 v1(55.448,40.792) ; U1.C2@57.353,40.157 v1(57.988,40.792) ; U1.C1@57.353,41.427 v1(57.988,42.062) ; U1.B2@58.623,40.157 v1(59.258,40.792) ; U1.B1@58.623,41.427 v1(59.258,42.062) ; U1.A2@59.893,40.157 v1(60.528,40.792) ; U1.A1@59.893,41.427 v1(60.528,42.062)
  Top Layer w0.508: v1(55.448,40.792) U1.D1@56.083,41.427 U1.C1@57.353,41.427
  Signal w0.254: J2.13@43.783,66.643 J2.13@43.783,66.292 44.882,67.392 60.624,67.392 62.192,65.824 62.192,63.425 H2.1@64.555,61.062
  other v1: 60.96,43.993 60.96,45.009 60.96,46.025 61.015,47.648 61.015,48.664 40.945,55.524 40.945,56.413 40.945,57.252 40.919,58.09
2.2V_PGood: J3.9 R14.1 | length 59.7
  Signal w0.178: J3.9@19.558,4.318 19.609,4.267 20.587,4.267 21.64,3.213 28.016,3.213 29.781,4.978 33.635,4.978 33.694,4.919 50.669,4.919 51.75,6 51.75,24.25 52.5,25 55.744,25 v1(55.752,24.992)
  Bottom Layer w0.178: R14.1@55.593,28.194 55.593,25.157 v1@55.75,25
3.8VPGOOD: J3.5 R31.2 U2.B7 | length 33
  Top Layer w0.178: U2.B7@35.689,18.44 36.324,19.075 39.091,19.075 R31.2@39.522,19.507
  Top Layer w0.203: v1(35.079,19.05) U2.B7@35.689,18.44
  Signal w0.203: J3.5@17.018,6.858 17.125,6.965 18.085,6.965 19.527,8.407 27,8.407 28,9.407 28,16 29,17 34.5,17 35.079,17.579 v1(35.079,19.05)
  Bottom Layer w0.203: v1(35.079,19.05) v1@35.104,19.05
3.8VRUN: C33.1 R23.1 R24.1 R25.2 U2.G8 | length 16.6
  Top Layer w0.254: v1(29.313,16.332) 29.326,16.345 29.326,17.158 U2.G8@29.339,17.17
  Signal w0.178: v1(29.313,16.332) 29.313,8.634 30.937,7.01 v1@31.42,7.01
  Bottom Layer w0.178: v1(31.407,7.001) 31.407,6.134 C33.1@31.471,6.071 31.471,4.953 R25.2@31.801,4.623 31.656,4.478 R24.1@31.656,3.251 31.682,3.226 R23.1@32.944,3.226
+3.8V: C31.1 C32.1 H10.1 J2.19 J2.20 J2.21 J2.22 U2.A1 U2.A2 U2.A3 U2.B1 U2.B2 U2.B3 U2.C1 U2.C2 U2.C3 U2.D1 U2.D2 U2.D3 | length 32.2
  Top Layer w0.254: U2.D3@33.149,23.52 v1(33.784,24.155) ; U2.D2@33.149,24.79 v1(33.784,24.155) ; U2.D1@33.149,26.06 v1(33.784,25.425) ; U2.C3@34.419,23.52 v1(35.054,24.155) U2.B2@35.689,24.79 ; U2.C2@34.419,24.79 v1(33.784,24.155) ; U2.C1@34.419,26.06 35.003,25.476 v1(35.054,25.476) ; U2.B3@35.689,23.52 v1(36.324,24.155) ; U2.B1@35.689,26.06 36.273,25.476 36.349,25.476 36.933,26.06 U2.A1@36.959,26.06 ; U2.A3@36.959,23.52 v1(36.324,24.155) ; U2.A2@36.959,24.79 v1(36.324,24.155)
  Signal w0.178: H10.1@14.351,64.135 17.272,64.135 20.193,61.214 31.084,61.214 J2.22@33.623,63.752
  other v1: 37.814,24.102 37.814,25.372 36.37,25.467 35.083,26.848 33.75,26.896 36.29,26.896 37.814,26.896 36.019,28.524 36.019,29.439 36.019,30.251
-3.8V: C39.1 C40.1 H9.1 J2.25 J2.26 J2.27 J2.28 R37.1 U3.A4 U3.A5 U3.B4 U3.B5 | length 18.8
  Top Layer w0.178: U3.A5@27.534,46.634 27.534,48.843 27.814,49.124
  Signal w0.178: H9.1@11.125,64.135 12.522,65.532 16.891,65.532 17.399,65.024 24.731,65.024 J2.28@26.003,63.752
  other v1: 28.448,45.212 26.924,45.974 28.448,46.736 27.908,47.47 25.908,47.498 26.924,47.498 28.169,48.92 28.148,49.753 27.661,50.571 27.686,51.308 27.686,52.07
-3.8VRun: C37.1 R32.1 R33.1 R34.2 U3.G3 | length 10.6
  Top Layer w0.178: U3.G3@24.994,39.014 v1(25.629,38.379)
  Bottom Layer w0.178: R33.1@22.125,37.195 R33.1@22.047,37.117 22.047,38.329 22.733,39.014 24.994,39.014 v1(25.629,38.379) 25.629,38.304 25.476,38.151 C37.1@25.476,37.033 ; R34.2@25.205,35.763 25.476,36.035 C37.1@25.476,37.033 ; R32.1@26.975,37.059 26.949,37.033 C37.1@25.476,37.033
ADJ: R27.2 U2.A7 | length 3.1
  Top Layer w0.254: U2.A7@36.959,18.44 39.045,18.44 39.653,17.832 R27.2@39.778,17.832
BIAS: R31.1 U2.G3 U2.G4 | length 14.9
  Top Layer w0.254: v1(28.246,23.114) 28.256,23.114 28.663,23.52 U2.G3@29.339,23.52 U2.G4@29.339,22.25 ; v1(38.583,20.65) 38.605,20.629 39.501,20.629 R31.1@39.522,20.607
  Signal w0.254: v1(28.246,23.114) 29.034,22.327 36.832,22.327 38.508,20.65 v1(38.583,20.65) v1@38.659,20.65
ClockOUT: H8.1 U1.F4 | length 29.5
  Top Layer w0.254: v1(53.035,37.109) U1.F4@53.543,37.617
  Signal w0.178: v1(53.035,37.109) 52.375,36.449 52.375,35.375 54.367,33.383 54.367,33.367 54.788,32.947 54.788,31.212 v1@55,31 ; v1(55.002,30.992) 56.744,29.25 61.219,29.25 61.75,28.719 61.75,18.21 H8.1@63.96,16
COMP1: C18.1 U1.G1 U1.G3 | length 5.4
  Top Layer w0.254: v1(51.638,42.062) U1.G1@52.273,41.427 ; v1(51.765,39.395) U1.G3@52.273,38.887
  Bottom Layer w0.254: v1(51.638,42.062) 51.638,42.037 52.375,41.3 52.375,40.704 52.432,40.646 52.432,40.049 C18.1@52.705,39.776 52.432,39.503 51.942,39.503 51.834,39.395 v1(51.765,39.395)
COMP2: C19.1 U1.E1 U1.E3 | length 13.7
  Top Layer w0.254: U1.E3@54.813,38.887 v1(55.448,39.522) ; U1.E1@54.813,41.427 v1(55.448,42.062)
  Signal w0.178: v1(55.448,42.062) 56.286,42.901 62.431,42.901 62.431,42.869 62.548,42.752 v1(62.548,42.663)
  Signal w0.254: v1(55.448,39.522) 54.508,40.462 54.508,41.097 55.448,42.037 v1(55.448,42.062)
  Bottom Layer w0.178: v1(62.548,42.663) 62.548,43.574 C19.1@62.56,43.586
DRVCC: C15.1 U1.G7 | length 7.2
  Top Layer w0.254: v1(51.638,33.172) U1.G7@52.273,33.807
  Signal w0.178: v1@51.359,30.734 v1(51.333,30.734) 51.867,31.267 53.162,31.267 53.492,31.598 53.492,32.182 52.502,33.172 v1(51.638,33.172)
  Bottom Layer w0.178: C15.1@50.546,30.505 50.775,30.734 v1(51.333,30.734)
  Bottom Layer w0.254: v1(51.638,33.172) v1@51.701,33.172
EN_0.9V_SPARE: J3.8 R2.2 | length 50.5
  Signal w0.178: J3.8@22.098,4.318 22.098,4.348 23.084,5.334 23.114,5.334 23.368,5.588 33.528,5.588 33.841,5.275 50.522,5.275 51.25,6.003 v1@51.25,25
  Bottom Layer w0.178: v1(51.288,25.078) 51.288,26.261 R2.2@51.435,26.408
Enable_0V9: J1.09 R1.2 | length 32.9
  Signal w0.178: J1.09@36.207,6.379 37.328,7.5 48.318,7.5 49.993,9.175 v1(49.993,25.039)
  Bottom Layer w0.178: R1.2@49.116,26.746 49.116,25.917 v1(49.993,25.039)
FB: R36.2 U3.A3 | length 4.1
  Top Layer w0.178: R36.2@22.809,49.124 22.809,48.999 23.624,48.184 24.839,48.184 24.943,48.08 24.943,46.685 U3.A3@24.994,46.634
FIN: C34.1 U2.J8 U2.K8 U2.L8 | length 1.1
  Top Layer w0.254: U2.J8@26.799,17.17 26.799,16.459 27.027,16.231 v1(27.027,16.129)
  other v1: 19.839,16.078 20.728,16.078 21.617,16.078 23.59,16.228 24.86,16.228 26.13,16.228
FSET: R17.2 U1.F1 | length 2
  Top Layer w0.254: U1.F1@53.543,41.427 v1(53.543,42.062)
  Bottom Layer w0.254: v1(53.543,42.062) 53.592,42.014 53.592,41.56 54.129,41.022 R17.2@54.254,41.022